# Altium PCB PCB2.PcbDoc (part 2 of 2)
Units mil, origin at the board's own origin, x right, y up, seen from the top; angles counter-clockwise.
Board outline 5000.03 x 3685 mil, 2 copper layers (Top Layer, Bottom Layer), stack 13.6 mil thick; 255 components, 133 nets, 710 pads, 295 vias.
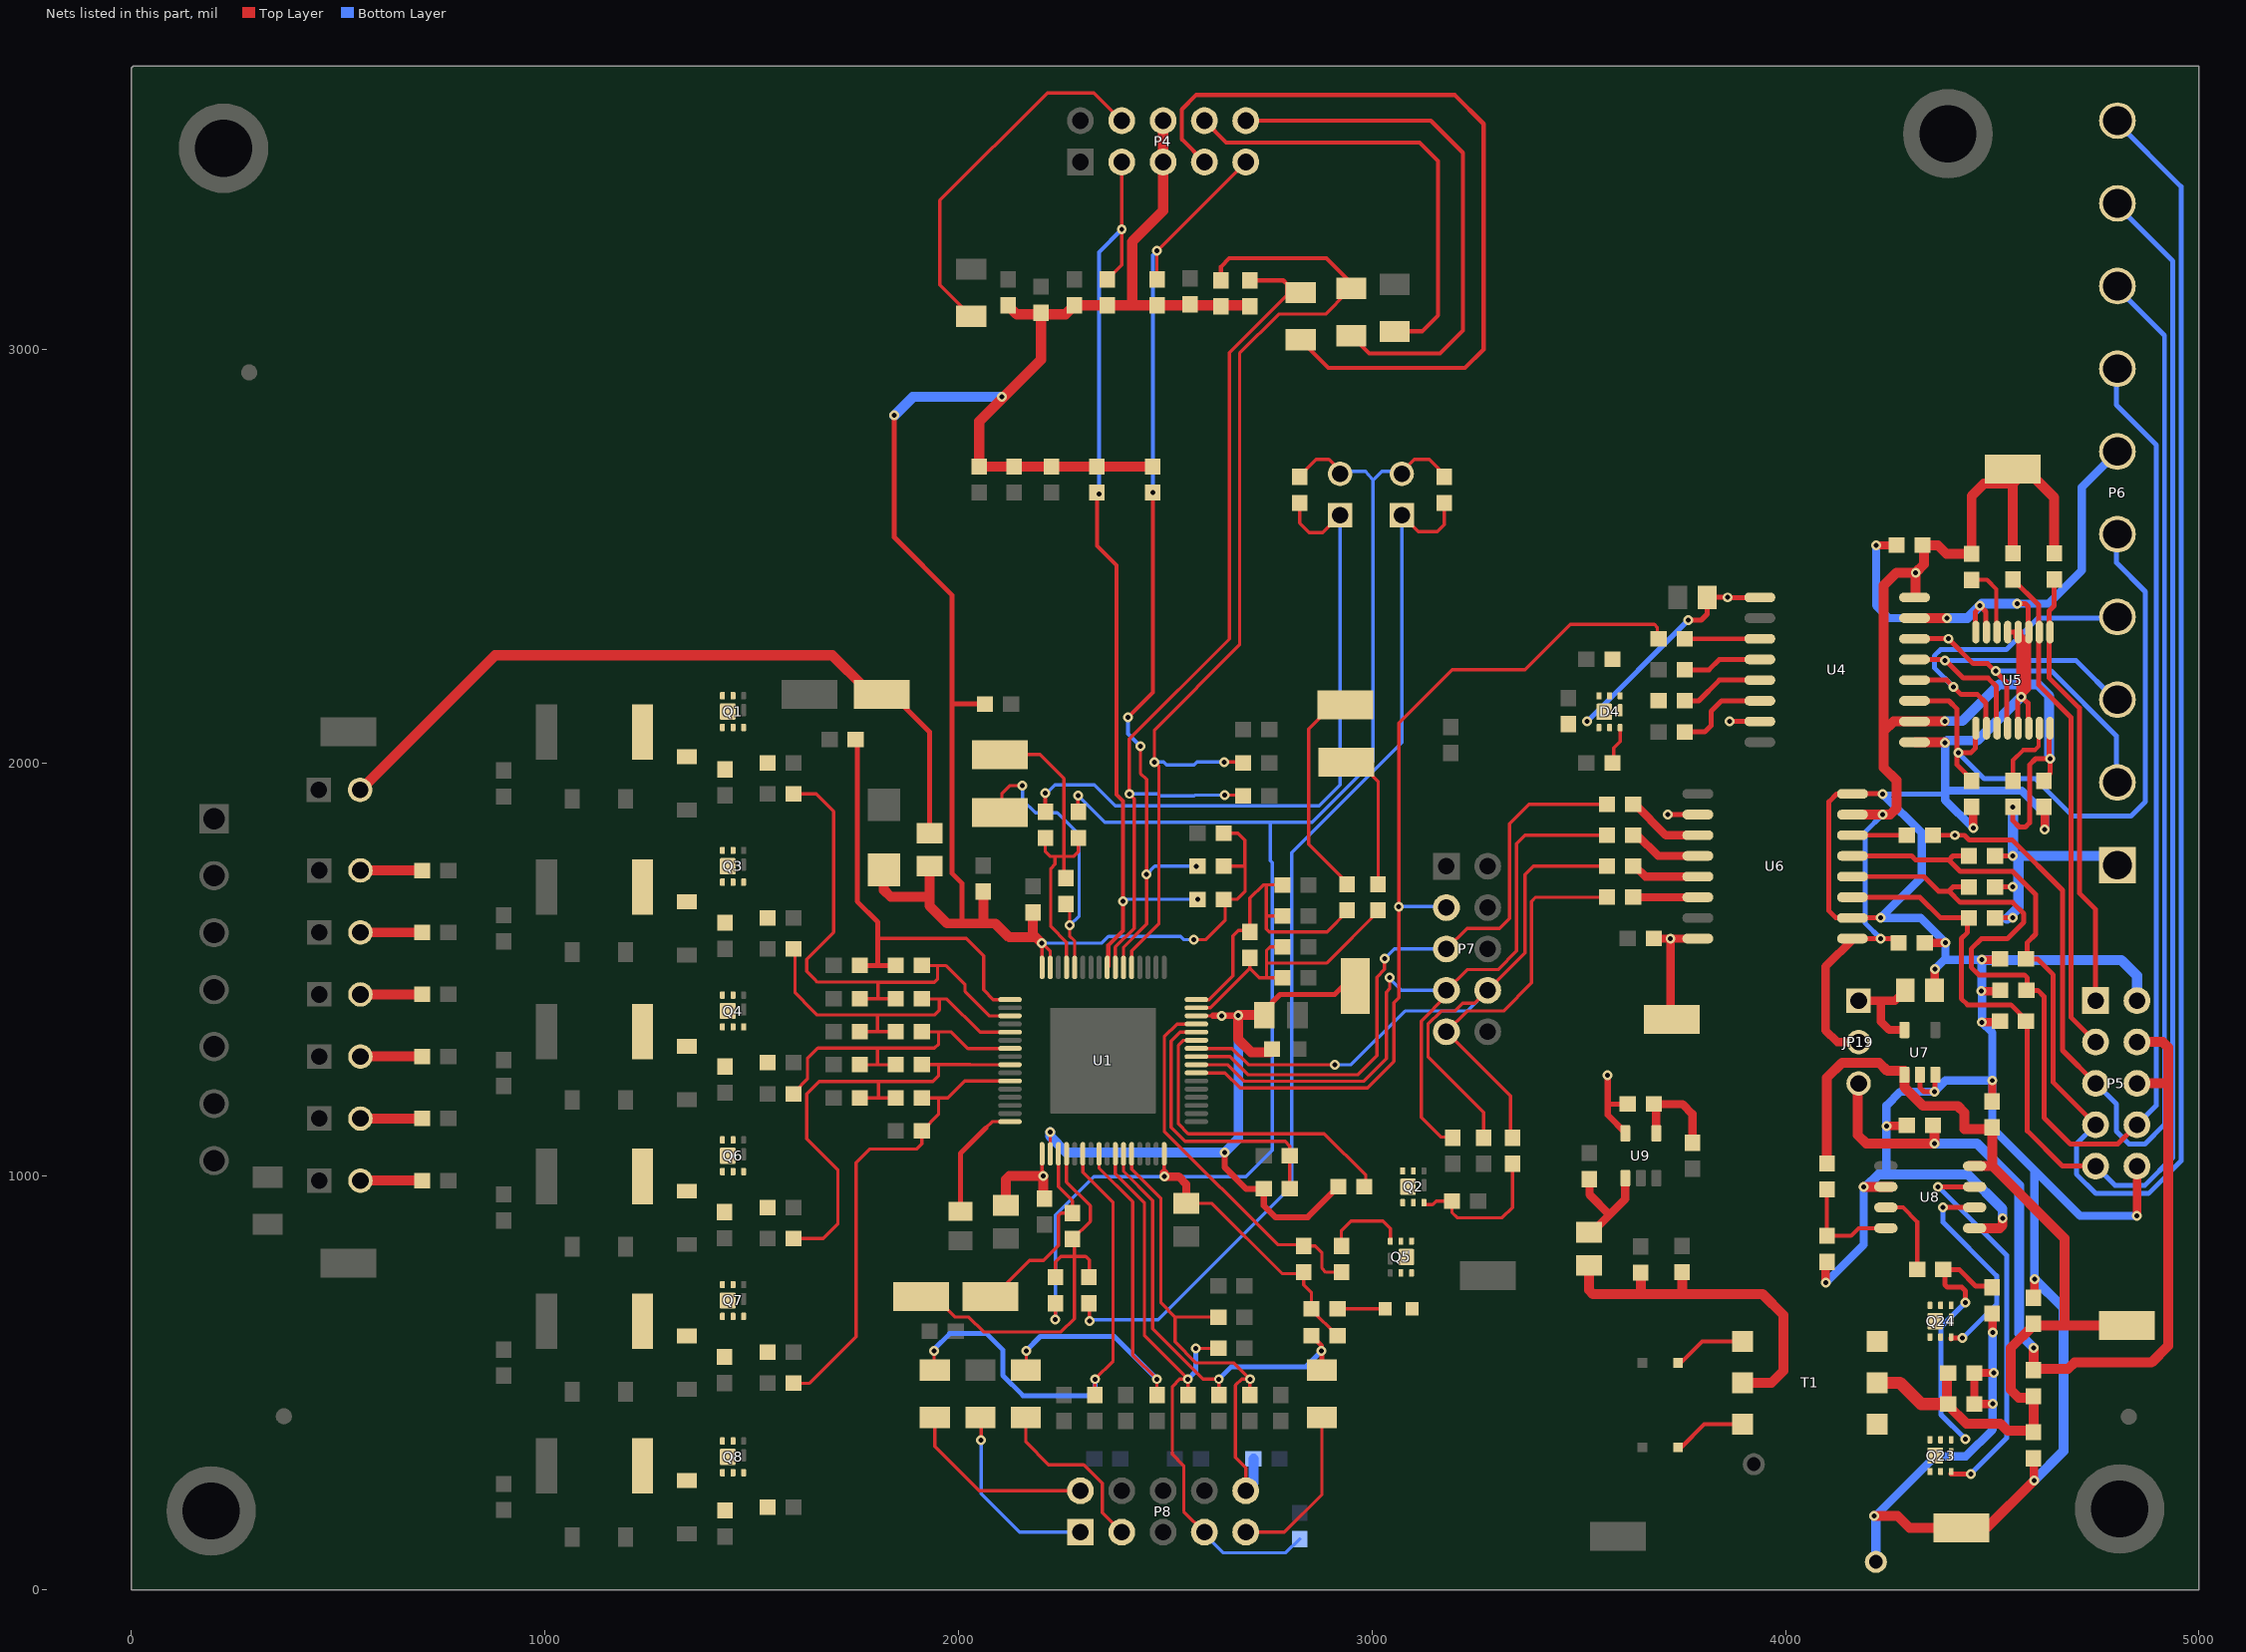
[diagram p2: the nets of this part, all layers, seen from the top]

## Via types
v1: diameter 24, hole 12, Top Layer to Bottom Layer, tented both sides, 269 vias
v2: diameter 19.68, hole 7.87, Top Layer to Bottom Layer, 25 vias
v3: diameter 20, hole 12, Top Layer to Bottom Layer, tented both sides, 1 vias

## Nets (pads, with @x,y where several pads share a name; then routed paths per layer and width w, separated by ;. In a path a pad name is that pad's centre, name@x,y a point inside that pad or via, vN(x,y) a via of type N, cw(c..) or ccw(c..) an arc to the next point about the centre after c; other vN are vias at no path point) (continued)
1-DRDY_S: R54.2 R58.2 U1.22 | length 1208.7
  Top Layer w8: v1(1941,578) 1941,534.57 R54.2@1943,532.57 ; U1.22@2300.79,1051.65 2300.79,1010.44 2374,937.23 2374,554 v1(2330,510) R58.2@2330,475
  Bottom Layer w12: v1(1941,578) 1941,582 1979,620 2068,620 2107,581 2107,519 2156,470 2313,470 2330,487 v1(2330,510)
1-FAULT: P7.3 R188.1 U1.39 | length 2210.2
  Top Layer w8: U1.39@2578.35,1250.47 2644.95,1250.47 2681.42,1214 2989,1214 3053.2,1278.2 3053.2,1419.71 3065.1,1431.61 v1(3065.1,1652.5) 3065.1,2096.38 3193.72,2225 3370,2225 3480,2335 3683,2335 3690,2328 R188.1@3690,2300
  Bottom Layer w8: v1(3065.1,1652.5) 3177.5,1652.5 P7.3@3180,1650
1-FAULT_N: C3.2 C36.1 P4.3 R5.1 U1.56 | length 2333.5
  Top Layer w8: R5.1@2360,3169.25 2395,3204.25 v1(2395,3290) P4.3@2395,3452.75 ; C36.1@2575,1669.32 C36.1@2575,1670
  Top Layer w10: C3.2@2335,2653.5 2335,2650.55 2335,2525 2382.13,2477.87 2382.13,1923.5 2398.13,1907.5 v1(2398.13,1665) 2398.13,1594.34 2362.62,1558.84 2362.62,1508.17 U1.56@2359.84,1505.39
  Bottom Layer w8: v1(2398.13,1665) 2403.13,1670 v1(2578.5,1670)
  Bottom Layer w10: v1(2340,2650.55) 2340,3235 v1(2395,3290)
1-FAULT_S: R56.2 R60.2 U1.24 | length 1055.2
  Top Layer w8: R56.2@2163,531.57 2164,532.57 v1(2164,578) ; U1.24@2340.16,1051.65 2340.16,1020 2421.61,938.55 2421.61,568.39 v1(2480,510) R60.2@2480,475
  Bottom Layer w12: v1(2164,578) 2164,579 2198,613 2377,613 v1(2480,510)
1-LDOA: C44.1 C45.1 U1.17 | length 259.3
  Top Layer w8: v1@2202.36,1001.21 U1.17@2202.36,1051.65
  Top Layer w24: C45.1@2115,930 2115,992.77 2123.44,1001.21 2202.36,1001.21 v1(2205.7,1001.21) 2205.7,950 C44.1@2205,950
1-LDOD1: C46.1 C47.1 R70.2 R94.2 TP-VPROG1.1 U1.18 U1.46 | length 1845.4
  Top Layer w8: v1(2222,1107) v1(2222,1107) U1.18@2222.05,1054.61 ; U1.46@2575.39,1388.27 2616.11,1388.27
  Top Layer w12: C47.1@2740,1390 2740,1402.23 2777.77,1440 2910,1440 2945,1475 TP-VPROG1.1@2960,1490
  Top Layer w15: v1(2643.85,1058.21) 2643.85,1021.75 2695.6,970 R94.2@2738.5,970 2738.5,929.58 2766.62,901.46 2844.96,901.46 R70.2@2918.5,975
  Top Layer w16: 2616.11,1388.27 2636.56,1388.27 v1(2637,1388) 2636.56,1388.32 2636.56,1388.46 2637,1388.46 v1@2670.48,1388.46 ; v1@2676,1384.02 2674.01,1386.01 2671.02,1389 v1(2677,1389)
  Top Layer w24: v1@2676,1384.02 2676,1332.22 2708.22,1300 C46.1@2755,1300 ; v1(2677,1389) 2678,1390 C47.1@2740,1390
  Bottom Layer w24: v1(2222,1107) 2222,1097.03 2260.82,1058.21 v1(2643.85,1058.21) 2677,1091.36 v1(2677,1389)
1-REG50: C22.1 C23.1 C43.1 J2.2 J3.2 R13.2 R77.2 R86.2 RT1.2 RT2.2 U1.32 | length 4360.3
  Top Layer w8: v1(2234.61,654.07) 2234.61,693.11 C22.1@2235,693.5 ; v1(2289,1921) 2289,1884.5 2291,1882.5 C23.1@2290,1881.5 ; U1.32@2497.64,1054.61 2497.77,1054.47 v1@2497.77,1009.77 ; C43.1@2551,935 2612.5,935 2782.5,765 R86.2@2835,765 ; RT2.2@2825,2680 RT2.2@2825,2691.5 2825,2694 2865,2734 2896,2734 J3.2@2925,2705 ; R86.2@2835,768.5 R86.2@2835,765 ; R13.2@2916.5,615 2853.5,677.99 R77.2@2853.5,680 2853.5,719.5 2835,738 R86.2@2835,765 ; J2.2@3074.15,2705.85 3102.31,2734 3139,2734 3175,2698.01 RT1.2@3175,2691.5 RT1.2@3175,2680
  Top Layer w20: v1@2497.77,1009.77 v1(2497.77,999.51) 2532.49,999.51 2551,981 C43.1@2551,935
  Top Layer w24: C23.1@2290,1877 C23.1@2291.03,1877
  Bottom Layer w8: v1(2234.61,654.07) 2234.61,906.67 2327.45,999.51 v1(2497.77,999.51) 2695.51,999.51 2759,1063 2759,1758.81 2754.53,1763.28 2754.53,1856.04 ; v1(2289,1921) 2353.96,1856.04 2754.53,1856.04 ; J3.2@2925,2705 2984.43,2705 3002.62,2683.77 ; J2.2@3075,2705 3072,2705 3023.85,2705 3002.62,2683.77 ; 2754.53,1856.04 2855.46,1856.04 3002.62,2003.2 3002.62,2683.77
1-SCLK_N: R6.1 R10.1 R103.2 U1.55 | length 2206.4
  Top Layer w8: U1.55@2379.53,1508.35 2379.53,1554.53 2425,1600 2425,1913.16 v1(2413.13,1925.03) 2413.13,2057.44 2655,2299.31 2655,2992.09 R10.1@2795,3132.09 ; v1(2644.1,1922.03) 2685,1922.03 R103.2@2685,1920
  Top Layer w10: R6.1@2705,3166.5 2785.59,3166.5 2795,3157.09 2795,3137.09 2795,3132.09 R10.1@2795,3127.09
  Bottom Layer w8: v1(2413.13,1925.03) 2482.08,1925.03 2487.11,1920 2570.01,1920 2572.04,1922.03 v1(2644.1,1922.03)
1-SCLK_S: C9.1 C11.1 P8.7 R61.2 U1.26 | length 1480.1
  Top Layer w8: U1.26@2379.53,1051.65 2379.53,1006.34 2450,935.86 2450,615 v1(2555,510) ; R61.2@2555,475 v1(2555,510) ; v1(2574.05,584.02) 2625,584.02 C11.1@2625,585 ; P8.7@2595,140 2545,190 2545,300 2517.42,327.58 2517.42,492.42 2535,510 v1(2555,510)
  Bottom Layer w8: P8.7@2595,140 2595,135 2640,90 2791.5,90 C9.1@2825,123.5
  Bottom Layer w12: v1(2555,510) 2574.05,529.05 v1(2574.05,584.02)
1-SDI_N: R8.1 R11.1 R104.2 U1.53 | length 2536.3
  Top Layer w8: U1.53@2418.9,1508.35 2418.9,1545.92 2485,1612.02 2485,1991.14 v1(2474.12,2002.02) 2474.12,2079.12 2680,2285 2680,2990 2775,3085 2887.76,3085 R11.1@2940,3137.24 ; v1(2643.1,2002.02) 2685,2002.02 R104.2@2685,2000
  Top Layer w10: R8.1@2635,3166.5 2635,3200 2655,3220 2890,3220 2956.46,3153.54 R11.1@2961.39,3148.61
  Bottom Layer w8: v1(2474.12,2002.02) 2496.58,2002.02 2503.6,1995 2570.01,1995 2577.03,2002.02 v1(2643.1,2002.02)
1-SDI_S: C8.1 C12.1 P8.10 R63.2 U1.28 | length 1215.1
  Top Layer w8: U1.28@2418.9,1051.65 2418.9,1017.37 2489.82,946.45 2489.82,694.02 2523.84,660 ; C12.1@2625,660 2523.84,660 ; P8.10@2695,240 2695,295.78 2670,320.78 2670,495 2685,510 v1(2705,510) ; R63.2@2705,475 v1(2705,510) ; 2523.84,660 2523.84,600.29 2575.13,549 2666,549 v1(2705,510)
  Bottom Layer w24: P8.10@2713.5,258.5 C8.1@2713.5,317.5
1-SDO_N: C5.2 C35.1 P4.9 R7.1 U1.54 | length 2304.7
  Top Layer w8: U1.54@2399.21,1505.39 2399.21,1554.21 2455,1610 v1(2455,1730) 2455,1960 2440,1975 v1(2440,2040) ; R7.1@2480,3169.25 v1(2480,3237.75) P4.9@2695,3452.75 ; C35.1@2575,1749.78 C35.1@2575,1750
  Top Layer w10: v1(2410,2110) 2470,2170 v1(2470,2653.5)
  Bottom Layer w8: v1(2455,1730) 2475,1750 v1(2575.57,1750)
  Bottom Layer w10: v1(2410,2110) 2410,2070 v1(2440,2040) ; v1(2470,2653.5) 2470,3227.75 v1(2480,3237.75)
1-SDO_S: R13.1 R62.2 R65.2 U1.27 | length 1065
  Top Layer w8: U1.27@2399.21,1051.65 2399.21,1012.36 2470,941.57 2470,631.5 2591.5,510 v1(2630,510) R62.2@2630,475
  Top Layer w12: R13.1@2853.5,615 2878,590.5 v1(2878,578) 2879,577 R65.2@2879,531.57
  Bottom Layer w12: v1(2630,510) 2660,540 2840,540 v1(2878,578)
1-SPI-MISO: P7.5 R206.2 U1.41 | length 1536.5
  Top Layer w8: U1.41@2578.35,1289.84 2656.17,1289.84 2700.01,1246 2966,1246 3012.19,1292.19 3012.19,1482 3030.42,1500.23 v1(3030.42,1526.65) ; P7.5@3180,1550 3230,1600 3309,1600 3332.47,1623.47 3332.47,1852.47 3380,1900 R206.2@3565,1900
  Bottom Layer w8: v1(3030.42,1526.65) 3053.77,1550 P7.5@3180,1550
1-SPI-MOSI: P7.8 R82.1 R201.2 U1.42 | length 1822.6
  Top Layer w8: U1.42@2578.35,1309.53 2661.93,1309.53 2701.46,1270 v1(2910.15,1270) ; R82.1@3265,1095 3266.75,1096.75 3270,1100 3270,1155.03 3135.5,1289.53 3135.5,1368.43 3167.07,1400 3200.15,1400 3218.83,1418.68 3248.68,1418.68 P7.8@3280,1450 3370,1540 3370,1730 3390,1750 R201.2@3565,1750
  Bottom Layer w8: v1(2910.15,1270) 2950,1270 3080,1400 3230,1400 P7.8@3280,1450
1-SPI-SCLK: P7.7 R80.1 R203.2 U1.40 | length 1968
  Top Layer w8: U1.40@2578.35,1270.16 2651.01,1270.16 2691.17,1230 2980,1230 3035,1285 3035,1445.69 3042.7,1453.39 v1(3042.7,1481.4) ; R80.1@3195,1095 3167,1095 3119.5,1142.5 3119.5,1376.02 3180,1436.52 P7.7@3180,1450 3230,1500 3305,1500 3349.97,1544.97 3349.97,1804.97 3370,1825 R203.2@3565,1825
  Bottom Layer w8: v1(3042.7,1481.4) 3042.7,1478.57 3071.27,1450 P7.7@3180,1450
1-SPI-SS: P7.9 R73.1 R197.2 | length 954.2
  Top Layer w8: R73.1@3335,1095 3335,1195 P7.9@3180,1350 3230,1400 3318,1400 3386,1468 3386,1665 3396,1675 R197.2@3565,1675
1-VBAT: C1.1 C2.1 C3.1 C4.1 C5.1 C16.1 C35.2 C36.2 C37.2 C38.2 C41.1 P4.5 P4.6 R2.2 R3.2 R4.2 R5.2 R6.2 R7.2 R8.2 R9.2 R68.2 U1.63 U1.64 Z1.2 | length 5224.9
  Top Layer w8: U1.64@2202.36,1508.35 2201.91,1508.8 v1(2201.91,1564.12) 2222.05,1543.98 U1.63@2222.05,1508.35 ; v1(2569.42,1572.72) 2598.46,1572.72 2645,1619.26 2645,1670 2673.68,1670 2693.45,1689.78 2693.45,1749.78 2693,1750.23 ; C35.2@2645,1750 2645,1750.23 2693,1750.23 ; C37.2@2645,1830 2676.41,1830 2693,1813.41 2693,1750.23
  Top Layer w12: v1(1845,2840) 1845,2545 1985,2405 1985,2142.55 ; 2008.94,1611.69 2008.94,1708.4 1985,1732.34 1985,2142.55 ; C38.2@2060.67,2142.55 1985,2142.55
  Top Layer w24: Z1.2@1820,1750.5 Z1.2@1820,1741.26 1820,1692.33 1836.19,1676.14 1930,1676.14 ; R68.2@1930,1755 R68.2@1930,1750 1930,1676.14 ; C16.1@2060,1685 2060,1611.69 ; C41.1@2180,1635 2180,1585.32 ; v1(2201.91,1564.12) 2201.55,1563.77 2180,1585.32 ; 1930,1676.14 1930,1653.87 1972.18,1611.69 2008.94,1611.69 2060,1611.69 ; 2060,1611.69 2089,1611.69 2122.69,1578 2180,1578 2180,1585.32
  Top Layer w25: R2.2@2120,3106.25 2141.25,3085 R3.2@2200,3085 ; R3.2@2200,3088.5 R3.2@2200,3085 ; C5.1@2470,2716.5 C3.1@2335,2716.5 C2.1@2225,2716.5 C1.1@2135,2716.5 C4.1@2050,2716.5 2050,2800 2050,2825 2069.61,2844.61 2107.5,2882.5 2200,2975 R3.2@2200,3085 ; P4.6@2495,3552.75 P4.5@2495,3452.75 2495,3335 2420,3260 2420,3106.25 ; R6.2@2700,3106.25 2635,3106.25 2560,3106.25 R7.2@2480,3106.25 2420,3106.25 ; R3.2@2200,3085 2258.75,3085 R4.2@2280,3106.25 R5.2@2360,3106.25 2420,3106.25
  Bottom Layer w8: v1(2201.91,1564.12) 2347.11,1564.12 2362.99,1580 2537,1580 2544.28,1572.72 v1(2569.42,1572.72)
  Bottom Layer w25: v1(1845,2840) 1890,2885 v1(2105,2885)
1-VC1: C30.2 C40.1 R109.2 U1.11 | length 1154.7
  Top Layer w8: R109.2@1601.5,500 1640,500 1752.42,612.42 1752.42,1032.82 1786.08,1066.48 1899.48,1066.48 1911.5,1078.5 C40.1@1911.5,1110 1912.45,1110 1952,1149.55 1952,1190 ; C30.2@1911.5,1190 1952,1190 ; U1.11@2124.61,1230.79 2014.95,1230.79 1974.17,1190 1952,1190
1-VC2: C27.2 C29.1 C30.1 R98.2 U1.9 | length 1153.1
  Top Layer w8: R98.2@1605,850 1673.26,850 1708.43,885.17 1708.43,1016.24 1633.31,1091.35 1633.31,1199.94 1663.2,1229.83 1938.06,1229.83 1952.12,1243.89 1952.12,1270.33 ; C29.1@1765,1190 1806.73,1190 ; 1806.73,1229.27 1806.73,1190 ; C30.1@1845,1190 1806.73,1190 ; C27.2@1915,1270.33 1952.12,1270.33 ; 2028.96,1270.33 1952.12,1270.33 ; 2029.13,1270.16 U1.9@2121.65,1270.16
1-VC3: C24.2 C26.1 C27.1 R92.2 U1.7 | length 803.3
  Top Layer w8: R92.2@1605,1200 1605,1206 1635,1236 1635,1284.94 1660.32,1310.26 1942.28,1310.26 1952.12,1320.1 1952.12,1349.35 ; C26.1@1765,1270 1804.48,1270 ; 1804.48,1308.86 1804.48,1270 ; C27.1@1845,1270 1804.48,1270 ; C24.2@1915,1349.35 1952.12,1349.35 ; U1.7@2124.61,1309.53 2022.96,1309.53 1983.13,1349.35 1952.12,1349.35
1-VC4: C19.2 C21.1 C24.1 R79.2 U1.5 | length 867.5
  Top Layer w8: R79.2@1605,1550 1605,1443.57 1646.13,1402.45 1658.17,1390.41 1941.44,1390.41 1953.53,1402.5 1953.53,1428.94 ; C21.1@1765,1350 1804.76,1350 ; 1804.76,1389.29 1804.76,1350 ; C24.1@1845,1350 1804.76,1350 ; C19.2@1915,1428.94 1953.53,1428.94 ; U1.5@2121.65,1348.9 2052.1,1348.9 1972.06,1428.94 1953.53,1428.94
1-VC5: C15.2 C18.1 C19.1 R72.2 U1.3 | length 1272.6
  Top Layer w8: R72.2@1605,1925 1655.83,1925 1698.46,1882.36 1698.46,1590.46 1633,1524.99 1633,1496.01 1652.11,1476.89 1658.99,1470 1806,1470 ; C18.1@1765,1430 1805.32,1430 ; 1805.32,1468.59 1805.32,1430 ; 1806.45,1469.72 1942.28,1469.72 1949.59,1477.03 1949.59,1509.65 ; C19.1@1845,1430 1805.32,1430 ; C15.2@1915,1509.65 1949.59,1509.65 ; U1.3@2121.65,1388.27 2074.73,1388.27 2016,1447 2016,1463.87 1970.22,1509.65 1949.59,1509.65
1-VC6: C14.1 C15.1 R67.1 U1.1 | length 1082.2
  Top Layer w8: 1805.83,1575.17 2019.05,1575.17 2061,1533.22 2061,1451 2084.36,1427.64 U1.1@2124.61,1427.64
  Top Layer w12: R67.1@1755.02,2056.45 1755.02,1664.98 1805,1615 1805,1510 ; C14.1@1761.5,1510 1805,1510 ; C15.1@1848.5,1510 1805,1510
3.3_SW: C121.1 C122.1 C124.1 JP19.2 P6.1 R190.2 R191.2 R192.2 R195.2 R198.2 R199.2 R200.2 TP-19.1 U4.10 U4.16 U5.16 U6.1 U6.7 | length 4193.6
  Top Layer w12: U6.1@4164.4,1575.1 v1@4229.9,1575.1 ; v1(4230,1575) 4270,1575 C121.1@4270,1565 ; R198.2@4510,1625 v1(4550,1625) ; R199.2@4510,1700 v1(4550,1700) ; R200.2@4510,1775 v1(4550,1775) ; R195.2@4550,1890 4550,1860 4565,1845 4580,1845 4590,1855 4590,1995 4605,2010 v1(4640,2010) 4640,1975 C122.1@4625,1960 ; v1@4638,2012 4638,2083.86 U5.16@4638,2088.3
  Top Layer w20: U6.1@4164.4,1575.1 4096.8,1507.5 4096.8,1353.2 4125,1325 JP19.2@4177,1325
  Top Layer w24: U6.7@4162.11,1875.1 4253.3,1875.1 4268.4,1890.2 4268.4,1957.76 4237.5,1988.66 4237.5,2076.2 ; U4.16@4314.6,2399.9 4314.6,2400 4314.6,2459.6 v1(4315,2460) ; C124.1@4331.5,2526 4369,2526 4389.5,2505.5 R190.2@4450,2505.5 ; C124.1@4335,2525 4335,2480.36 4315,2460.36 v1(4315,2460) ; v1(4385,2101) 4385,2099.9 4384.9,2100 U4.10@4312.01,2100 4261.3,2100 4237.5,2076.2 ; R190.2@4450,2510 4450,2645 4480,2675 4545.55,2675 4547.47,2673.08 ; R192.2@4550,2506.5 4550,2670.55 4547.47,2673.08 ; R191.2@4650,2510 4650,2641.09 4582.74,2708.35 4567.19,2692.81 4547.47,2673.08 ; 4237.5,2076.2 4237.5,2429 4268.5,2460 v1(4315,2460)
  Bottom Layer w12: v1(4230,1575) 4193.2,1611.8 4193.2,1833.2 v1(4235,1875) ; v1(4550,1700) 4563.66,1700
  Bottom Layer w24: v1(4385,2101) 4427.4,2101 4516.4,2190 4610.26,2190 4638,2162.26 4638,2012 v1(4640,2010)
  Bottom Layer w25: 4536.02,1623.1 4563.66,1650.74 4563.66,1700 4563.66,1775 ; v1(4550,1893.5) v1(4550,1775) 4563.66,1775 ; P6.1@4802.59,1752.75 4780.34,1775 4563.66,1775
5V_USB: C125.1 JP19.3 P5.4 P5.6 R210.1 | length 2293.5
  Top Layer w24: JP19.3@4175,1225 4175,1100 4195,1080 v1(4360,1080) 4360,1124 C125.1@4360,1125 ; v1(4600,585) 4600,535 4683.63,535 4698.63,550 4885,550 4925.04,590.04 4925.04,1225 ; P5.6@4850,1225 4925.04,1225 ; P5.4@4850,1325 4912,1325 4925.27,1311.73 4925.27,1225 4925.04,1225
  Bottom Layer w24: v1(4360,1080) 4462.8,1080 4565,977.8 4565,620 v1(4600,585)
AGND: C121.2 C122.2 C124.2 C125.2 C126.2 C127.2 C128.2 C129.2 C133.2 C134.2 C136.2 C137.1 P5.2 P5.10 P6.6 R204.1 R207.1 R208.1 R209.1 R215.1 TP-AGN.1 U4.9 U4.15 U5.3 U5.4 U5.5 U5.7 U5.8 U5.13 U5.14 U6.2 U6.8 U7.2 U7.3 U8.2 U8.5 | length 9837.8
  Top Layer w12: 4124.06,1925 4105,1905.94 4105,1642 4121.1,1625.9 4161.11,1625.9 U6.2@4162.01,1625 ; U6.2@4164.4,1625.1 4229.9,1625.1 v1(4230,1625) ; U6.8@4164.4,1925.1 4234.9,1925.1 v1(4235,1925) ; U7.2@4325,1255 U7.2@4325,1245.87 4325,1215 4335,1205 v1(4360,1205) ; v1@4362,1207 4362,1245.87 U7.3@4362,1255 ; U5.8@4458.8,2307.3 4458.8,2316.14 4458.8,2365 4471.9,2378.1 4484.4,2365.6 4484.4,2316.14 U5.7@4484.4,2307.3 ; U5.5@4535.6,2307.3 U5.5@4535.6,2316.14 ; U5.5@4537.2,2316.14 U5.4@4561.2,2316.14 ; v1(4560,2385) 4580,2385 4586.8,2378.2 U5.3@4586.8,2316.14 ; U5.13@4561.1,2088.3 4561.1,2151.1 v1(4570,2160) ; U5.4@4561.2,2307.3 U5.4@4561.2,2316.14 ; U5.4@4562.8,2316.14 U5.4@4561.2,2316.14 ; U5.14@4586.7,2088.3 4586.7,2145 4585,2145 v1(4570,2160) ; U5.3@4586.8,2307.3 U5.3@4586.8,2316.14 ; v1(4570,2160) 4588.39,2178.39 U5.3@4588.39,2316.14 U5.3@4586.8,2316.14
  Top Layer w20: v1(4097,743) 4097,790.5 C136.2@4100,793.5 ; v1(4219,2526) C124.2@4268.5,2526 ; v1(4244,1122) 4291.5,1122 C125.2@4293.5,1124 ; C121.2@4336.5,1565 v1(4387,1565) ; C126.2@4360.43,1450 4361,1450.57 v1(4361,1501) ; R204.1@4450,1893.5 4454,1889.5 v1(4454,1842) ; v1(4474,1448) 4517.5,1448 R208.1@4519.5,1450 ; v1(4475,1373) 4516.5,1373 R207.1@4518.5,1375 ; v1(4475,1524) 4516.5,1524 R209.1@4518.5,1526 ; R215.1@4500,668.5 4501,667.5 v1(4501,623) ; C129.2@4500,1181.5 v1(4500,1232) ; v1(4501,450) C134.2@4456.5,450 C133.2@4456.5,525 v1(4504,525) ; C127.2@4600,318.5 4601,317.5 v1(4601,265) ; C128.2@4600,706.5 4602,708.5 v1(4602,752) ; C122.2@4625,1893.5 4627,1891.5 v1(4627,1839) ; v1@4850,905.3 P5.10@4850,1025
  Top Layer w24: v1@4189.05,975 U8.2@4242.72,975 U8.2@4255,975 ; v1(4214.33,178.87) 4271.13,178.87 4300,150 TP-AGN.1@4425,150 4486,150 v1(4601,265) ; U4.9@4314.6,2049.9 4386,2049.9 v1(4386,2049) ; U4.15@4314.6,2349.9 v1@4389.9,2349.9 ; U8.5@4444,875 U8.5@4457.28,875 4518.2,875 4524.8,881.6 v1(4524.8,898.6)
  Top Layer w25: U5.4@4562.8,2316.14 4562.8,2305.7 4570,2298.5 v1(4570,2160)
  Bottom Layer w12: v1(4235,1925) 4377.9,1925 4386,1933.1
  Bottom Layer w20: v1(4097,743) 4189.05,835.05 v1(4189.05,974.87) ; v1@4218.57,178.87 4362.96,323.26 4436,323.26 4501,388.26 v1(4501,450) v1(4501,623) ; v1(4219,2526) 4219,2380.4 4249.4,2350 v1(4390,2350) ; v1(4235,1925) 4329.7,1830.3 4329.7,1724.7 v1(4230,1625) 4327,1625 v1(4387,1565) 4387,1527 ; 4243.7,1005.07 4244,1005.37 v1(4244,1122) 4244,1171.5 4277.5,1205 v1(4360,1205) 4387,1232 v1(4500,1232) ; v1(4361,1501) 4387,1527 ; v1(4386,2049) 4386,1933.1 ; v1(4454,1842) 4386,1910 4386,1933.1 ; v1(4474,1448) 4474,1523 v1(4475,1524) ; v1(4560,2385) 4635.8,2385 4716.5,2465.7 4716.5,2666.66 P6.6@4802.59,2752.75 ; v1(4602,752) 4602,1012.2 ; v1(4627,1839) 4627,1877.44 4571.34,1933.1 4386,1933.1 ; v1(4849.4,904.7) 4712.4,904.7 4500,1117.1 v1(4500,1232) ; 4387,1527 4390,1524 v1(4475,1524) ; v1(4475,1524) 4475,1523 v1(4475,1373) 4500,1348 v1(4500,1232)
  Bottom Layer w24: v1(4189.05,974.87) 4194.7,974.87 4224.9,1005.07 4243.7,1005.07 4440.83,1005.07 4524.8,921.1 v1(4524.8,898.6) ; v1(4214.33,178.87) 4218.64,174.56 C137.1@4218.64,67.89 ; v1(4386,2049) 4391,2054 4464,2054 v1(4570,2160) ; v1(4390,2350) 4440,2350 v1(4470,2380) 4475,2385 v1(4560,2385) ; v1(4601,265) 4672.4,336.4 4672.4,681.6 v1(4602,752)
  Bottom Layer w25: v1@4474,1523 4475,1523 4812.3,1523 4850,1485.3 P5.2@4850,1425
ALERT: P6.3 U4.13 U5.11 | length 776.6
  Top Layer w12: U4.13@4314.6,2249.9 4314.7,2250 v1@4383.75,2250 ; v1(4385.79,2247.96) v1@4383.75,2250 ; U5.11@4509.9,2088.3 4509.9,2185 4489.9,2205 4430,2205 4386.41,2248.59 4385,2250 v1@4383.75,2250
  Bottom Layer w12: v1(4385.79,2247.96) 4702.04,2247.96 P6.3@4800,2150
CONV: P6.5 R204.2 U4.11 U5.9 | length 1600.3
  Top Layer w12: U4.11@4314.6,2149.9 4395,2149.9 4414.9,2130 4414.9,2030 4415,2029.9 4415,2025 v1(4418,2024) ; R204.2@4450,1960 4415,1995 4415,2024 v1(4418,2024) ; U5.9@4458.7,2088.3 4458.7,2083.86 4458.7,2035 4448.7,2025 4418,2025 v1(4418,2024)
  Bottom Layer w12: v1(4418,2024) 4480.7,1961.3 4604.45,1961.3 4694.75,1871 4835,1871 4870,1906 4870,2414 4800,2484 P6.5@4800,2550
CS: P5.9 P6.9 R198.1 R207.2 U6.3 | length 3740
  Top Layer w12: U6.3@4164.4,1675.1 4164.5,1675 4325,1675 4375,1625 4440,1625 4440,1590 4425,1575 4425,1430 4440,1415 4545,1415 4583.25,1376.75 4585,1375 4585,1110 4670,1025 P5.9@4750,1025
  Bottom Layer w12: P5.9@4750,1025 4796.5,978.5 4869.26,978.5 4936.5,1045.74 4936.5,3213.5 P6.9@4800,3350
DRDY: P6.4 U4.12 U5.10 | length 822
  Top Layer w12: U4.12@4314.6,2199.9 4314.7,2200 4390,2200 v1@4405.9,2184.1 ; v1(4405.9,2183.59) v1@4405.9,2184.1 ; U5.10@4484.3,2088.3 4484.3,2145 4464.3,2165 4425,2165 4406.15,2183.84 v1@4405.9,2184.1
  Bottom Layer w12: v1(4405.9,2183.59) 4359.79,2229.7 4359.79,2258.72 4375.02,2273.96 4534.41,2273.96 4610.45,2350 P6.4@4800,2350
FAULT: P6.2 U4.14 U5.12 | length 842.3
  Top Layer w12: U4.14@4314.6,2299.9 4314.6,2299.96 v1(4394.09,2299.96) 4454.05,2240 4488.9,2240 4534.9,2194 4534.9,2088.9 U5.12@4535.5,2088.3
  Bottom Layer w12: v1(4508.1,2222.5) 4642.5,2222.5 4800,2065 P6.2@4800,1950
GPIO0/I2C(SDA): P5.3 R192.1 U5.2 | length 1201.3
  Top Layer w12: R192.1@4550,2443.5 4612.4,2381.1 4612.4,2316.14 4612.4,2187.86 4690,2110.26 4690,1385 P5.3@4750,1325
GPIO1/I2C(SCL): P5.1 R191.1 U5.1 | length 1069.9
  Top Layer w12: R191.1@4650,2443.5 4650,2380 4638,2368 4638,2316.14 4638,2205.04 4710.5,2132.54 4710.5,1685 4750,1645.5 P5.1@4750,1425
NetC22_2: C22.2 R84.1 R89.2 TP-2.1 U1.20 | length 1021.2
  Top Layer w8: TP-2.1@1910,710 1942,710 1992,660 2025,660 2061,624 2248.48,624 2280.7,656.22 2280.7,806.2 ; TP-2.1@1955,711 TP-2.1@1959,711 ; C22.2@2235,760 2235,792.92 2248.28,806.2 2280.7,806.2 ; U1.20@2261.42,1054.61 2261.42,986.58 2319,929 2319,891.5 R89.2@2276,848.5 ; R89.2@2280.7,845 2280.7,806.2 ; R84.1@2316.29,760 2316.29,797.72 2307.81,806.2 2280.7,806.2
NetC23_2: C23.2 R85.1 R91.2 TP-4.1 U1.61 | length 866.2
  Top Layer w8: TP-4.1@2100,2020 2197,2020 2255,1962 2255,1774 ; R85.1@2210,1818.5 2210,1785.06 2221.06,1774 2255,1774 ; 2233.4,1773.94 2233.4,1754.6 2223.25,1744.46 2223.25,1604.21 2261.42,1566.05 U1.61@2261.42,1505.39 ; R91.2@2260,1721.5 2255,1726.5 2255,1774 ; C23.2@2290,1818.5 2290,1785 2279,1774 2255,1774
NetC31_1: C31.1 C33.2 R106.1 R108.1 U1.47 | length 715.6
  Top Layer w8: U1.47@2575.39,1407.95 2609.95,1407.95 2705,1503 ; C33.2@2705,1528.5 2705,1503 ; C31.1@2783.5,1480 2745,1480 ; R108.1@2783.5,1555 2754,1555 2745,1546 2745,1516 ; R106.1@3015,1643.5 3015,1640 2891,1516 2745,1516 ; 2705,1503 2728,1480 2745,1480 ; 2745,1480 2745,1516
NetC32_1: C32.1 C33.1 R99.1 R101.1 U1.48 | length 777.2
  Top Layer w8: U1.48@2575.39,1427.64 2606.04,1427.64 2663.85,1485.45 2663.85,1581.85 2677,1595 2705,1595 2705,1672.9 2737.1,1705 2746.06,1705 ; 2749.31,1630 R101.1@2780,1630 ; C32.1@2780,1705 2746.06,1705 ; R99.1@2940,1640 2891.56,1591.56 2752.05,1591.56 2744.89,1598.72 2744.89,1703.83 2746.06,1705
NetC39_1: C39.1 U1.16 | length 291.8
  Top Layer w8: 2066,1117 2081.36,1132.36 U1.16@2124.61,1132.36
  Top Layer w12: C39.1@2005,915.43 2005,1056 2066,1117
NetC120_1: C120.1 C123.1 C135.1 D4.1 D4.2 D4.5 D4.6 D4.8 R212.1 TP-20.1 U4.1 U4.7 U6.10 U6.16 U9.5 | length 1223.3
  Top Layer w12: 3570,1175 R212.1@3615,1175 ; v1(3715,1875) 3715.1,1875.1 U6.10@3785.4,1875.1 ; v1(3765,2345) 3796,2345 3810.43,2359.43 C135.1@3810.43,2400 v1(3860,2400) 3860.1,2399.9 U4.1@3935.6,2399.9 ; v1(3865,2100) 3865.1,2099.9 U4.7@3935.6,2099.9
  Top Layer w15: v1(3570,1245) 3570,1175 3570,1149 3613,1106 3613,1104.13 U9.5@3613,1092
  Top Layer w20: C123.1@3681.5,1575 v1(3722,1575) ; TP-20.1@3725,1380 3722,1383 v1(3722,1575) ; U6.16@3787.99,1575 v1(3722,1575)
  Bottom Layer w12: v1(3520,2100) v1(3765,2345)
NetC126_1: C126.1 JP19.1 U7.5 | length 238.7
  Top Layer w20: JP19.1@4177,1425 4231,1425 ; U7.5@4287.6,1354.13 4250.87,1354.13 4231,1374 4231,1425 ; C126.1@4289.57,1450 4264.57,1425 4231,1425
NetC127_1: C127.1 C128.1 C129.1 C133.1 C134.1 R210.2 R211.1 T1.2 TP-SW1.1 U7.1 U8.8 | length 2382.8
  Top Layer w24: R211.1@4100,1035 4100,1238.28 4136.72,1275 4226.39,1275 4246.39,1255 4287.6,1255 4288,1255 4288,1245.87 4288,1215.23 4332.67,1170.56 4416.51,1170.56 4432.5,1154.57 4432.5,1115 4500,1115 4500,1025 ; C133.1@4390,525 4390,450 4391.75,448.25 4437.78,402.22 4519.8,402.22 4537.02,385 4600,385 4600,465 4564,465 4545,484 4545,585 4600,640 4675,640 ; U8.8@4444,1025 U8.8@4457.28,1025 4500,1025 ; TP-SW1.1@4825,640 4675,640 ; 4500,1025 4675,850 4675,640
  Top Layer w30: T1.2@4221.6,501 4277,501 4328,450 C134.1@4390,450
NetC130_1: C130.1 L1.2 U9.1 | length 277.3
  Top Layer w20: L1.2@3525,865 3532,865 3574.5,907.5 ; C130.1@3526,993.5 3526,956 3574.5,907.5 ; U9.1@3612.6,995.87 3612.6,945.6 3574.5,907.5
NetC131_1: C131.1 C132.1 L1.1 T1.5 | length 895.5
  Top Layer w24: L1.1@3525,780 3525,725 3535,715 3650,715 ; C132.1@3650,765 3650,715 ; C131.1@3750,765 3750,715 ; T1.5@3896.4,501 3966,501 3995,530 3995,665 3945,715 3750,715 ; 3650,715 3750,715
NetC136_1: C136.1 R211.2 U8.4 | length 274.7
  Top Layer w10: R211.2@4100,968.5 C136.1@4100,856.5 4158.5,856.5 4177,875 U8.4@4242.72,875 U8.4@4255,875
NetD1_1: D1.1 R77.1 | length 116
  Top Layer w8: R77.1@2916.5,680 D1.1@3032.52,680
NetD1_2: D1.2 Q5.1 Q5.2 Q5.5 Q5.6 Q5.8
NetD4_3: D4.3 R196.2 | length 88.1
  Top Layer w8: R196.2@3585,2000 3585,2036.16 3600.59,2051.75 D4.3@3600.59,2081.69
NetD4_4: D4.4 D4.7 R193.1 R202.2
NetD5_1: D5.1 T1.6 | length 172.1
  Top Layer w10: D5.1@3747.5,345 3803.5,401 T1.6@3896.4,401
NetD6_1: D6.1 T1.4 | length 170
  Top Layer w10: D6.1@3747.5,550 3798.5,601 T1.4@3896.4,601
NetJ1_2: J1.2 R68.1 TP-C2.1 | length 1836.2
  Top Layer w12: TP-C2.1@1825,2180 1827.5,2177.5 1930,2075 R68.1@1930,1830 R68.1@1930,1825
  Top Layer w25: J1.2@555,1935 880,2260 1695,2260 1775,2180 1815,2180 TP-C2.1@1825,2180
NetJ2_1: J2.1 R84.2 RT1.1 | length 2580.8
  Top Layer w8: R84.2@2315,693.5 2317,691.5 v1(2317,651) ; J2.1@3072,2599 3112,2559 3158,2559 3175,2576 RT1.1@3175,2628.5
  Bottom Layer w8: v1@2314.4,653.42 2317,653.42 2483.42,653.42 2806,976 2806,1783.19 3072,2049.19 J2.1@3072,2599
NetJ3_1: J3.1 R85.2 RT2.1 | length 1637.3
  Top Layer w8: RT2.1@2825,2628.5 2825,2580 2848,2557 2881,2557 J3.1@2923,2599
  Top Layer w10: R85.2@2210,1881.5 v1(2210.03,1926.43)
  Top Layer w24: R85.2@2209,1878 R85.2@2210,1878
  Bottom Layer w8: v1@2209.8,1923.12 2211.57,1924.89 2233.8,1947.12 2328.52,1947.12 2379.64,1896 2872.79,1896 2923,1946.21 J3.1@2923,2599
NetJP13_2: JP13.2 R47.1 | length 144
  Top Layer w24: JP13.2@556,1740 R47.1@700,1740
NetJP14_2: JP14.2 R48.1 | length 144
  Top Layer w24: JP14.2@556,1590 R48.1@700,1590
NetJP15_2: JP15.2 R49.1 | length 144
  Top Layer w24: JP15.2@556,1440 R49.1@700,1440
NetJP16_2: JP16.2 R50.1 | length 144
  Top Layer w24: JP16.2@556,1290 R50.1@700,1290
NetJP17_2: JP17.2 R51.1 | length 144
  Top Layer w24: JP17.2@556,1140 R51.1@700,1140
NetJP18_2: JP18.2 R52.1 | length 144
  Top Layer w24: JP18.2@556,990 R52.1@700,990
NetP4_4: P4.4 R1.2 | length 887.4
  Top Layer w8: R1.2@2031,3079.66 1955,3155.66 1955,3360 2215,3620 2327.75,3620 P4.4@2395,3552.75
NetP4_7: P4.7 R10.2 | length 1957.6
  Top Layer w10: P4.7@2595,3452.75 2540,3507.75 2540,3580 2575,3615 3200,3615 3270,3545 3270,3000 3225,2955 2895,2955 R10.2@2827.5,3022.5
NetP4_8: P4.8 R12.2 | length 1109.4
  Top Layer w10: P4.8@2595,3552.75 2647.75,3500 3115,3500 3160,3455 3160,3082 3121.47,3043.47 3055,3043.47 R12.2@3045,3043.47
NetP4_10: P4.10 R11.2 | length 1297.7
  Top Layer w10: P4.10@2695,3552.75 3142.25,3552.75 3220,3475 3220,3045 3165,2990 2993.07,2990 R11.2@2950.08,3032.99
NetP8_1: P8.1 R55.1 | length 463.8
  Top Layer w8: R55.1@2053,417.4 2055,415.4 v1(2055,362)
  Bottom Layer w8: v1(2055,362) 2055,233 2148,140 P8.1@2295,140
NetP8_2: P8.2 R54.1 | length 467.7
  Top Layer w8: R54.1@1943,418.4 R54.1@1943,417.4 1943,347 2050,240 P8.2@2295,240
NetP8_3: P8.3 R56.1 | length 423.3
  Top Layer w8: R56.1@2163,417.4 2163,358 2218,303 2303,303 2348,258 2348,187 P8.3@2395,140
NetP8_9: P8.9 R65.1 | length 410.6
  Top Layer w8: P8.9@2695,140 2788,140 2879,231 R65.1@2879,417.4 R65.1@2879,419.91
NetQ1_1: Q1.1 Q1.2 Q1.5 Q1.6 Q1.8 R66.1
NetQ1_3: Q1.3 R69.2 R71.2 Z3.1
NetQ2_1: Q2.1 Q2.2 Q2.5 Q2.6 Q2.8 R70.1 U1.43 | length 773.8
  Top Layer w8: U1.43@2578.35,1329.21 U1.43@2575.39,1329.21 2544.21,1329.21 2532,1317 2532,1127 2555.79,1103.21 2884.79,1103.21 2985,1003 R70.1@2985,975
NetQ2_3: Q2.3 R73.2 R75.2 | length 366.4
  Top Layer w8: Q2.3@3125.59,931.69 3146.69,931.69 3155,940 R75.2@3193.5,940 3193.5,912.5 3206,900 3315,900 3340,925 R73.2@3340,1030.5
NetQ3_1: Q3.1 Q3.2 Q3.5 Q3.6 Q3.8 R74.1
NetQ3_3: Q3.3 R76.2 R78.2 Z5.1
NetQ4_1: Q4.1 Q4.2 Q4.5 Q4.6 Q4.8 R81.1
NetQ4_3: Q4.3 R87.2 R90.2 Z7.1
NetQ5_3: Q5.3 R88.1 | length 198.9
  Top Layer w8: R88.1@2926,831.5 2926,869 2949,892 3027,892 3044.41,874.59 Q5.3@3044.41,848.31
NetQ6_1: Q6.1 Q6.2 Q6.5 Q6.6 Q6.8 R93.1
NetQ6_3: Q6.3 R95.2 R97.2 Z9.1
NetQ7_1: Q7.1 Q7.2 Q7.5 Q7.6 Q7.8 R100.1
NetQ7_3: Q7.3 R102.2 R107.2 Z11.1
NetQ8_1: Q8.1 Q8.2 Q8.5 Q8.6 Q8.8 R110.1
NetQ8_3: Q8.3 R111.2 R112.2 Z13.1
NetQ23_1: Q23.1 Q23.2 Q23.5 Q23.6 Q23.8 T1.1
NetQ23_3: Q23.3 U8.7 | length 922.3
  Top Layer w12: v1(4369.02,975.07) 4444,975.07 U8.7@4444,975 ; Q23.3@4400.59,281.69 4400.59,280.93 v1(4448.21,280.93)
  Bottom Layer w12: v1(4369.02,975.07) 4535,809.09 4535,367.71 v1(4448.21,280.93)
NetQ23_4: Q23.4 Q23.7 Q24.4 Q24.7 R214.2 R215.2 | length 631.6
  Top Layer w12: v1(4435,695) 4435,723.29 4426.44,731.85 4391.6,731.85 4385,738.45 4385,775 4420,775 4460,735 R215.2@4500,735
  Bottom Layer w12: v1(4435,365) 4376,424 4376,636 v1(4435,695)
NetQ24_1: Q24.1 Q24.2 Q24.5 Q24.6 Q24.8 T1.3
NetQ24_3: Q24.3 U8.6 | length 498.3
  Top Layer w12: v1(4380.63,925.58) 4444,925.58 U8.6@4444,925 ; Q24.3@4400.59,606.69 4400.59,608.93 v1(4428.21,608.93)
  Bottom Layer w12: v1(4380.63,925.58) 4380.63,889.57 4510.48,759.72 4510.48,691.19 v1(4428.21,608.93)
NetR86_1: R86.1 R88.2 U1.45 | length 909.8
  Top Layer w8: U1.45@2575.39,1368.58 2528.58,1368.58 2498,1338 2498,1109 2772,835 2831.5,835 R86.1@2835,831.5 2862.5,831.5 2879,815 2879,778 2888.5,768.5 R88.2@2926,768.5
NetR89_1: R89.1 TP-3.1 U1.19 | length 481.9
  Top Layer w8: TP-3.1@2077,710 2085,710 2172,797 2206,797 2242,833 2242,905 2248.5,911.5 R89.1@2276,911.5 2276,941 2241.73,975.27 U1.19@2241.73,1054.61
NetR91_1: R91.1 TP-1.1 U1.60 | length 695.5
  Top Layer w8: TP-1.1@2105,1885 2105,1925 2125,1945 v1(2155,1945) ; R91.1@2260,1658.5 2269,1649.5 v1(2269,1607) 2269,1581 2281.1,1568.9 U1.60@2281.1,1505.39
  Bottom Layer w8: v1(2155,1945) 2155,1910 2186,1879 2239,1879 2292,1826 2292,1630 v1(2269,1607)
NetR94_1: R94.1 R96.2 U1.44 | length 688.3
  Top Layer w8: U1.44@2575.39,1348.9 2535.9,1348.9 2514,1327 2514,1119 2548.29,1084.71 2790.29,1084.71 2801.5,1073.5 R96.2@2801.5,1050 R94.1@2801.5,970
NetR99_2: R99.2 TP-5.1 | length 496.9
  Top Layer w8: TP-5.1@2900,2140 2900,2135 2847,2082 2847,1803 2929,1721 2940,1721 R99.2@2940,1710
NetR106_2: R106.2 TP-6.1 | length 380.7
  Top Layer w8: TP-6.1@2900,2005 2937.44,2005 2965,2005 3015,1955 R106.2@3015,1710
NetR188_2: R188.2 U4.3 | length 175.6
  Top Layer w12: R188.2@3760,2300 3760.1,2299.9 U4.3@3935.6,2299.9
NetR189_2: R189.2 U4.4 | length 185.9
  Top Layer w12: R189.2@3760,2225 3815.1,2225 3840,2249.9 U4.4@3935.6,2249.9
NetR190_1: R190.1 U5.6 | length 182
  Top Layer w10: R190.1@4450,2442.5 4487.5,2442.5 4510,2420 4510,2316.14 U5.6@4510,2307.3
NetR193_2: R193.2 U4.5 | length 196.3
  Top Layer w12: R193.2@3760,2150 3790.1,2150 3840,2199.9 U4.5@3935.6,2199.9
NetR194_2: R194.2 U4.6 | length 227.1
  Top Layer w12: R194.2@3760,2075 3805.1,2075 3820.1,2090 3820.1,2125 3845,2149.9 U4.6@3935.6,2149.9
NetR195_1: R195.1 U5.15 | length 174
  Top Layer w10: R195.1@4550,1956.5 4550,2006 4575,2031 4603,2031 4612.3,2040.3 4612.3,2083.86 U5.15@4612.3,2088.3
NetR197_1: R197.1 U6.14 | length 156.5
  Top Layer w20: R197.1@3631.5,1675 U6.14@3787.99,1675
NetR201_1: R201.1 U6.13 | length 166.9
  Top Layer w20: R201.1@3631.5,1750 3636,1750 3661,1725 U6.13@3787.99,1725
NetR203_1: R203.1 U6.12 | length 177.2
  Top Layer w20: R203.1@3631.5,1825 3642,1825 3692,1775 U6.12@3787.99,1775
NetR205_2: R205.2 U6.6 | length 131.5
  Top Layer w12: U6.6@4162.01,1825 R205.2@4293.5,1825
NetR206_1: R206.1 U6.11 | length 187.6
  Top Layer w20: R206.1@3631.5,1900 3636,1900 3711,1825 U6.11@3787.99,1825
NetR212_2: R212.2 R213.2 U9.4 | length 244
  Top Layer w20: R212.2@3681.5,1175 R212.2@3687,1175 ; U9.4@3687.4,1104.13 3687,1104.54 R212.2@3687,1175 ; R213.2@3775,1081.5 3775,1151 3751,1175 R212.2@3687,1175
NetR214_1: R214.1 U8.3 | length 193.3
  Top Layer w10: U8.3@4255,925 4284,925 4318.5,890.5 R214.1@4318.5,775
SCLK: P5.7 P6.10 R200.1 R209.2 U6.5 | length 4197.6
  Top Layer w12: U6.5@4164.4,1775.1 4164.5,1775 4305,1775 4315,1765 4395,1765 ; R200.1@4440,1775 4405,1775 4395,1765 ; P5.7@4750,1125 4647.48,1227.52 4647.48,1487.52 4610,1525 4585,1525 4585,1526 4585,1565.86 4605,1585.86 4605,1681.77 4549.27,1737.5 4422.5,1737.5 4395,1765
  Bottom Layer w12: P5.7@4750,1125 4703.5,1078.5 4703.5,1005.74 4750.74,958.5 4877.55,958.5 4956.5,1037.45 4956.5,3393.5 P6.10@4800,3550
SIMO: P5.8 P6.7 R199.1 R208.2 U6.4 | length 3387.4
  Top Layer w12: U6.4@4164.4,1725.1 4164.5,1725 4335,1725 4370,1690 4395,1690 ; R199.1@4440,1700 4405,1700 4395,1690 ; P5.8@4850,1125 4803.5,1078.5 4688.89,1078.5 4625,1142.39 4625,1435 4610,1450 4585,1450 4585,1480 4577.5,1487.5 4467.5,1487.5 4449,1506 4449,1550 4474,1575 4536.77,1575 4576,1614.23 4576,1635.77 4549.27,1662.5 4422.5,1662.5 4395,1690
  Bottom Layer w12: P6.7@4800,2950 4800,2865.25 4896.5,2768.75 4896.5,1171.5 P5.8@4850,1125
SOMI: P5.5 P6.8 R205.1 | length 3222.9
  Top Layer w12: R205.1@4360,1825 v1(4410,1825) 4432.62,1825 4444.62,1813 4548.77,1813 4670,1691.77 4670,1305 P5.5@4750,1225
  Bottom Layer w12: P5.5@4750,1225 4800,1175 4800,1109.24 4830.74,1078.5 4869.26,1078.5 4916.5,1125.74 4916.5,3033.5 P6.8@4800,3150
pads on no net: FID1.1 FID2.1 FID3.1 H1.1 H2.1 H3.1 H4.1 LBL1.0 U1.30 U1.31 U1.51 U1.62 U7.4 U8.1

## Polygon pours and split planes (outlines as drawn)
1-CELL0 on Top Layer "Top Layer-1cell0" (solid, remove dead copper, pour order 1000): 3400,0 3414.4,14.4 3414.4,3676.8 3.2,3676.8 0,3680 0,0
NetC120_1 on Top Layer "Top Layer-1cell0" (solid, remove dead copper, pour order 1001): 3460.1,3685 4019.6,3685 4019.6,0 3504.31,0 3466.43,-37.7
3.3_SW on Top Layer "Top Layer-1cell0" (solid, remove dead copper, pour order 1002): 4089.9,0 4089.9,3684.8 4090.09,3685 5000,3685 5000,0.03 5000.03,0
1-CELL0 on Bottom Layer "Top Layer-1cell0" (solid, remove dead copper, pour order 1003): 0,0 3397.6,0 4018.5,0 4018.5,3683.7 4019.8,3685 5,3685 0,3680
AGND on Bottom Layer "Top Layer-1cell0" (solid, remove dead copper, pour order 1004): 4089.8,0 4089.9,0.1 4089.9,3685 5000,3685 5000.03,3684.97 5000.03,0

## Keep-outs
Keep-Out Layer:
  lines w10: 0,3680 0,0 5000.03,0 ; 5,3685 5000,3685 5000,0.03

## Other copper
Top Layer:
  region net 1-CELL0: 2153.15,1195.35 2153.13,1195.37 2087.43,1195.37 2058.09,1166.03 2058.09,1148.01 2152.46,1148.01 2153.15,1147.32
  region net NetQ2_1: 3105,1035 3040,1035 3000,995 2970,995 2970,955 3000,955 3040,915 3105,915
  region net NetQ23_1: 4197,426 4197,330 4265,330 4330,265 4380,265 4380,338 4380,380 4338,380 4292,426
  region net 1-CELL3: 865,1234 865,940 1035,940 1035,1070 980,1070 980,1085 1340,1085 1420,1165 1557.98,1165 1557.98,1230 1340,1230 1245,1135 1085,1135 1085,1210 945,1210 921,1234
  region net 1-CELL1: 863.3,535 863.3,245 1030,245 1030,370 990,370 990,385 1335,385 1405,455 1557.98,455 1557.98,525 1335,525 1240,430 1100,430 1100,505 960,505 930,535
  region net 1-CELL0: 863.3,205 863.3,55 1560,55 1560,153 1319,153 1256,90 1147,90 1084,153 997,153 945,205
  region net 1-CELL4: 1470,1805 1545,1805 1545,1739 1470,1739
  region net NetQ3_3: 1319,1595 1557.98,1595 1557.98,1720 1485,1720 1470,1705 1470,1685 1460,1675 1390,1675 1380,1685 1319,1685
  region net NetQ24_1: 4380,595 4265,595 4246,576 4196,576 4196,625 4276,705 4380,705
  region net 1-CELL4: 865,1585 865,1266 1030,1266 1030,1420 985,1420 985,1435 1305,1435 1380,1510 1557.08,1510 1557.08,1570 1325,1570 1240,1485 1085,1485 1085,1570 945,1570 930,1585
  region net 1-CELL0: 3050,750 2985,750 2985,815 3050,815
  region net 1-CELL2: 863.3,910 863.3,567 1035,567 1035,720 980,720 980,735 1335,735 1410.25,810.25 1558.43,810.25 1558.43,875.91 1340.91,875.91 1245,780 1090,780 1090,855 973,855 918,910
  region net NetQ3_1: 1280,1630 1205,1630 1205,1765 1320,1765 1365,1810 1461,1810 1461,1690 1410,1690 1385,1715 1311,1715 1280,1684
  region net NetQ1_1: 1269,2010 1205,2010 1205,2190 1461,2190 1461,2070 1310,2070 1269,2029
  region net NetQ23_4: 4395,315 4450,315 4450,380 4395,380
  region net NetQ7_3: 1319,545 1558.43,545 1558.43,670 1485,670 1470,655 1470,640 1455,625 1410,625 1400,635 1319,635
  region net 1-CELL6: 1035,2140 866,2140 865,2139 865,1960 930,1960 975,2005 1035,2005
  region net NetD1_2: 3065,865 3065,750 3075,740 3075,660 3120,660 3120,865
  region net NetQ23_4: 4395,640 4450,640 4450,710 4395,710
  region net NetQ7_1: 1209,583 1209,715 1340,715 1390,765 1461,765 1461,645 1415,645 1395,665 1320,665 1265,610 1265,583
  region net 1-CELL0: 1470,380 1540,380 1540,311 1470,311
  region net 1-CELL3: 1470,1455 1540,1455 1540,1389 1470,1389
  region net NetC120_1: 3580,2185 3540,2185 3540,2140 3520,2120 3455,2120 3455,2075 3495,2075 3510,2060 3580,2060
  region net 1-CELL5: 865,1937 865,1618 1035,1618 1035,1770 980,1770 980,1790 1303.63,1790 1378.63,1865 1558.43,1865 1558.43,1945 1330,1945 1240,1855 1085,1855 1085,1937
  region net NetQ8_3: 1319,211 1355,175 1558.88,175 1558.88,295 1480,295 1470,285 1470,255 1460,245 1410,245 1375,280 1375,295 1319,295
  region net 1-CELL5: 1470,2180 1550,2180 1550,2113 1470,2113
  region net NetQ4_3: 1319,1245 1557.98,1245 1557.98,1370 1475,1370 1475,1335 1460,1320 1415,1320 1397,1338 1319,1338
  region net NetQ6_3: 1319,895 1558.43,895 1558.43,1020 1485,1020 1470,1005 1470,990 1460,980 1410,980 1393,997 1319,997
  region net NetQ8_1: 1211,365 1211,232 1267,232 1288,253 1288,315 1385,315 1405,295 1405,270 1461,270 1461,380 1405,380 1390,365
  region net 1-CELL0: 3120,965 3160,965 3160,1070 3120,1070
  region net NetQ6_1: 1210,1070 1210,935 1268,935 1268,973 1325,1030 1385,1030 1415,1000 1415,995 1461,995 1461,1105 1385,1105 1350,1070
  region net NetD4_4: 3570,2270 3570,2235 3590,2215 3590,2111 3616,2111 3635,2130 3705,2130 3705,2170 3660,2170 3650,2180 3650,2205 3600,2255 3600,2270
  region net 1-CELL2: 1470,1105 1540,1105 1540,1039 1470,1039
  region net 1-CELL1: 1470,755 1540,755 1540,689 1470,689
  region net NetQ4_1: 1287,1283 1210,1283 1210,1420 1325,1420 1370,1465 1461,1465 1461,1345 1415,1345 1390,1370 1325,1370 1287,1332
  region net NetQ1_3: 1558.43,1965 1558.43,2095 1475,2095 1475,2070 1450,2045 1319,2045 1319,1965
  region net 1-CELL0: 293,911 367,911 367,757 293,757

## Silkscreen, mask and mechanical layers (free items; w line width, h text height)
Top Overlay:
  lines w6: 2563,626 2581,608 2590,608
  lines w8: 3025,560 3045,560 ; 3080,530 3080,560 ; 3080,590 3080,560 ; 3115,560 3080,560 ; 4019.6,58.56 4019.6,1033.56 ; 4019.6,1233.56 4019.6,2490 ; 4049.6,58.56 4049.6,1033.56 ; 4070,1235 4070,2485 ; 4635,3005 4635,3685 ; 3080,560 3050,530 3050,590 3080,560
  lines w10: 1515,2255 820,2255 820,40 2065,40 ; 2065,2255 2235,2255 ; 2590,2255 3035,2255 ; 2920,40 3400,40 3400,1080 ; 3178.89,2250 3200,2250 3400,2250 3400,2005 ; 4965,40 3425,40 3425,2770 4630,2770 4630,3690 4965,3690 ; 2625,2255 3425,2255 3425,2905 2625,2905 2625,2255
  text "10" at 4556.8,3594.4 h37.5
  text "2" at 2057.56,3550.39 h25
  text "10" at 2912.27,3547.39 h25
  text "9" at 2916.77,3448.43 h25
  text "1" at 2065.06,3433.43 h25
  text "LBL" at 3804.9,3144.7 h60 r90
  text "By GONGv2" at 230.6,2695.7 h100
  text "ISOLATED COMMUNICATIONS INTERFACE" at 3480,2610 h35
  text "2016.03.23" at 226.6,2547.9 h100
  text "CAUTION" at 1300.7,2529.7 h100
  text "THERMISTORS CIRCUIT 1" at 2690,2435 h40
  text "HIGH VOLTAGE" at 1172.7,2418.7 h100
  text "THERMISTORS" at 2795,2285 h50
  text "TS2+" at 1905,2005 h45
  text "1" at 197.2,1994.3 h50
  text "2" at 3324,1985 h37.5
  text "1" at 3086,1982 h37.5
  text "CELL 6+" at 620,1915 h35
  text "TS2-" at 1905,1895 h45
  text "CELL 6+" at 267,1793 h35
  text "1" at 4635,1650 h37.5
  text "1" at 4940,1650 h37.5
  text "CELL 5+" at 267,1643 h35
  text "CELL 4+" at 268,1498 h35
  text "CELL 3+" at 269,1350 h35
  text "CELL 2+" at 269,1201 h35
  text "10" at 3445,1160 h37.5
  text "3.3V" at 3985,1160 h35
  text "9" at 3010,1155 h37.5
  text "H" at 2700,1110 h37.5
  text "5.0V" at 3985,1095 h35
  text "CELL 1+" at 269,1051 h35
  text "CELL 1-" at 420,880 h35
  text "S" at 2685,865 h37.5
  text "7" at 192.7,860.68 h50
  text "9" at 4701.34,744.9 h37.5
  text "10" at 4873,744 h37.5
  text "TS1-" at 1723.17,694.09 h45
  text "TS1+" at 2191.7,602.68 h45
  text "10" at 2930,295 h25
  text "2" at 2010,285 h25
  text "CIRCUIT 1" at 2975,155 h50
  text "9" at 2945,95 h25
  text "1" at 2010,85 h25

## Dimensions
0,0 to 5000,0.03 on Keep-Out Layer
5000,3685 to 5000.03,0 on Keep-Out Layer

## Text inside footprints (layer, text, board x,y; h text height)
Logo2: Top Overlay "Pb" at 1405.4,3486.1 h45